# Altium PCB PCB_FinalResult.PcbDoc
Units mil, origin at the board's own origin, x right, y up, seen from the top; angles counter-clockwise.
Board outline 3784.99 x 2012.51 mil, 2 copper layers (Top Layer, Bottom Layer); 61 components, 39 nets, 231 pads, 83 vias.
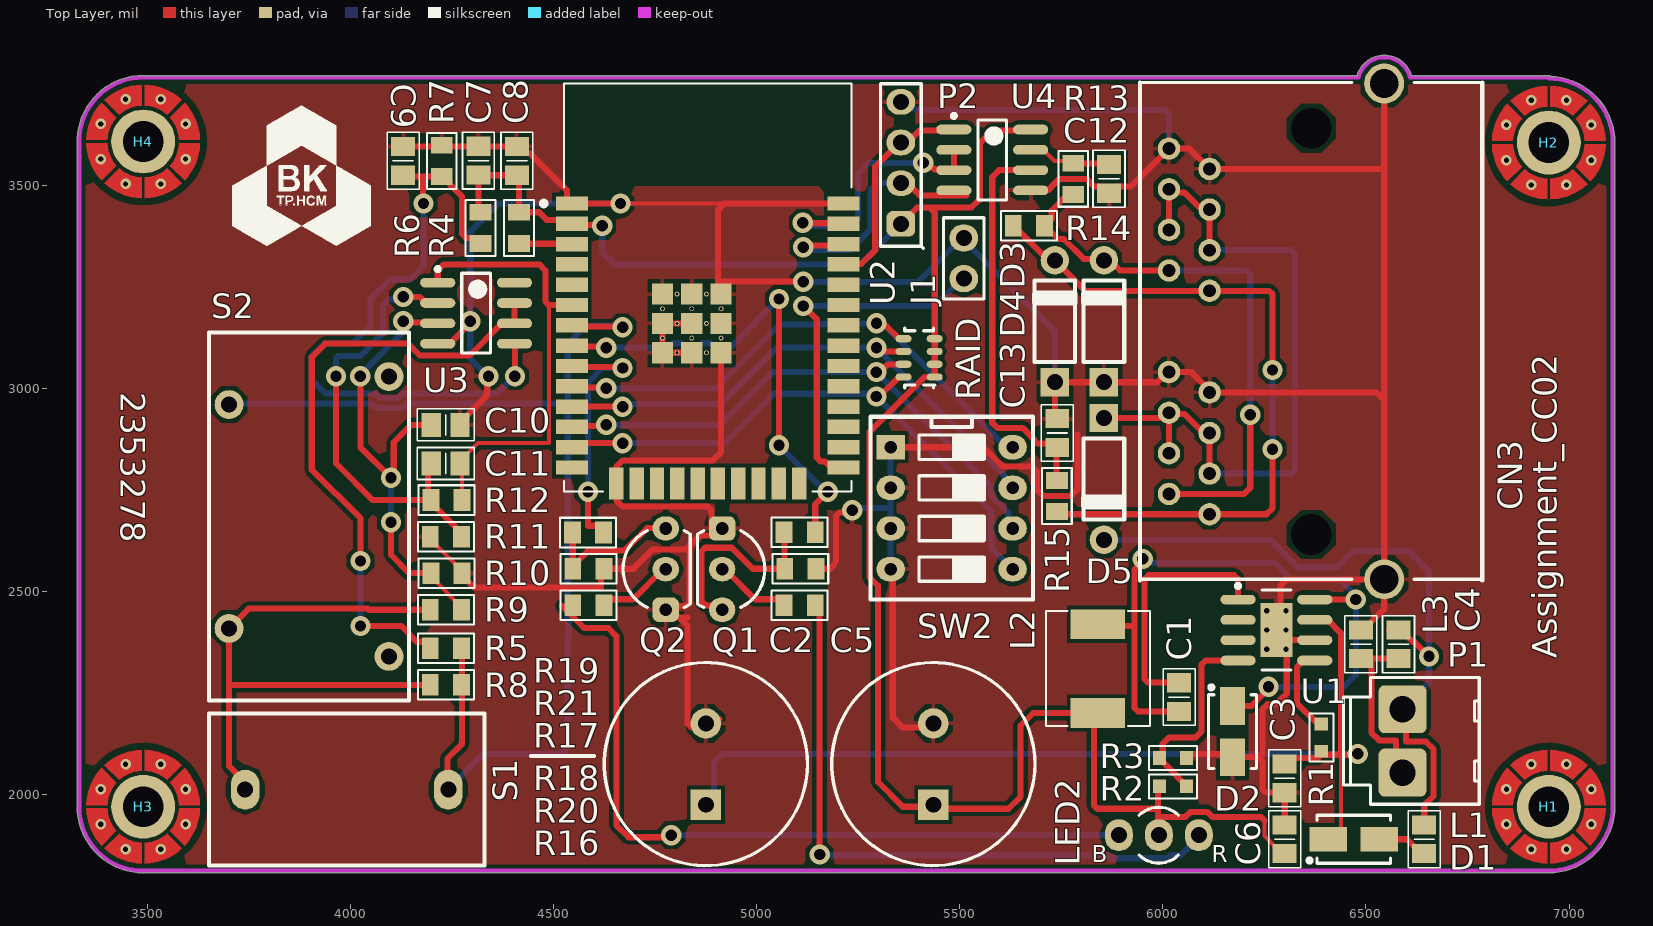
[diagram p0: Top Layer view]
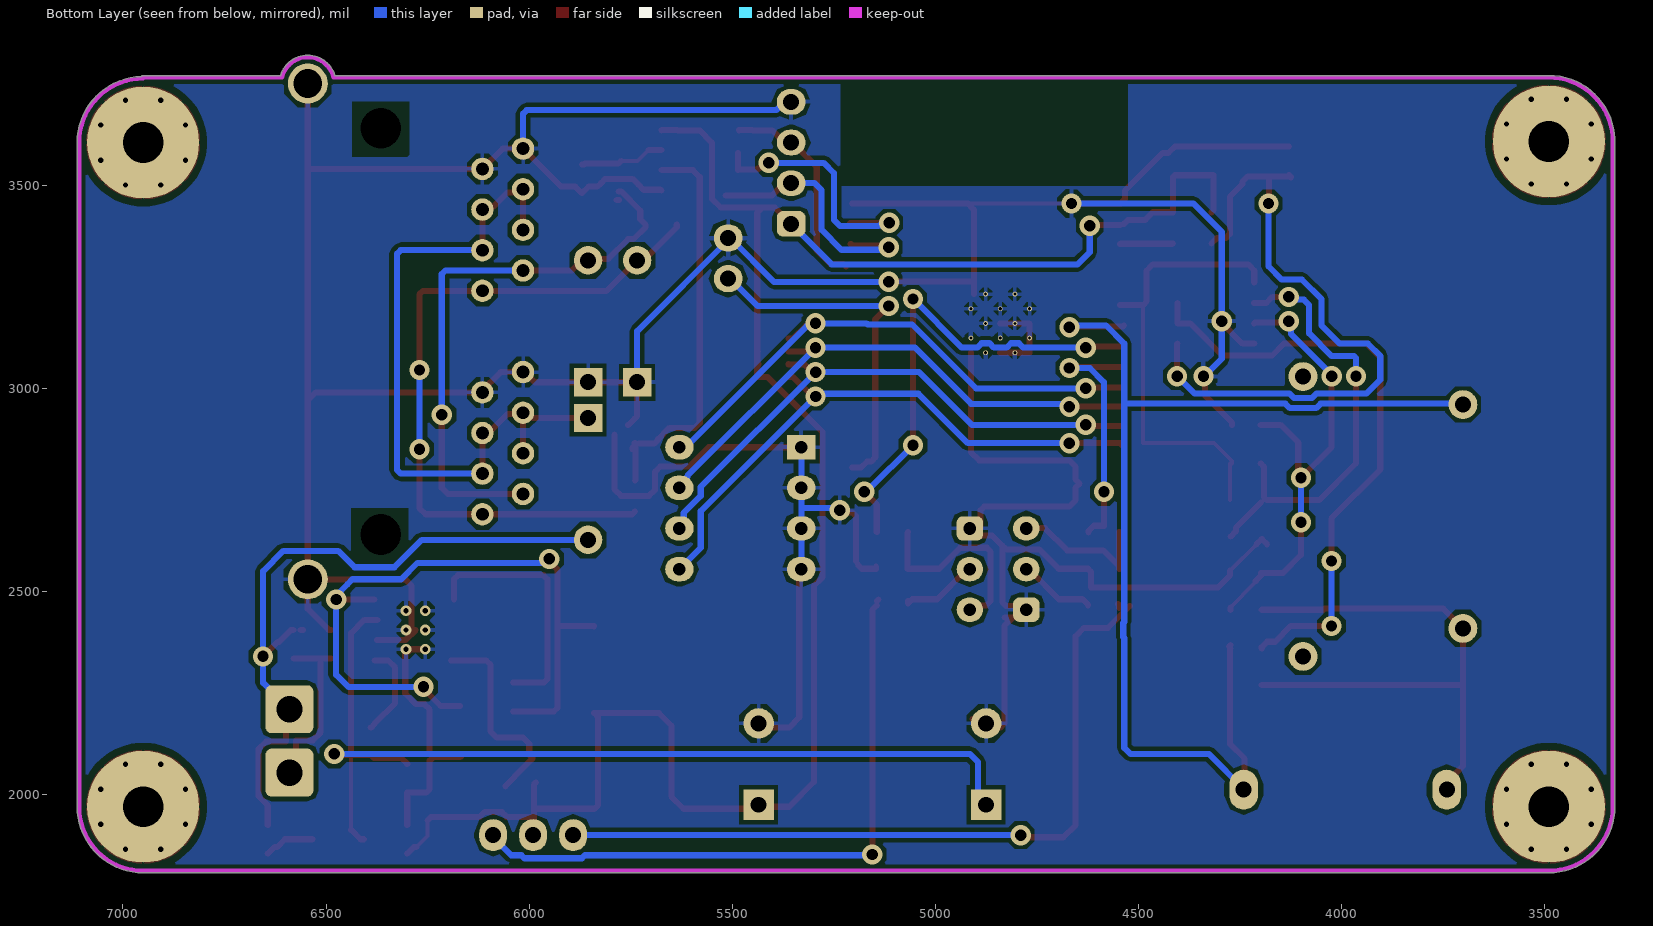
[diagram p1: Bottom Layer view, seen from below]

## Layer stack, top to bottom
Top Solder: solder mask 0.4, Solder Resist, Dk 3.5
Top Layer: signal copper 1.4
Dielectric 1: dielectric 12.6, FR-4, Dk 4.8
Bottom Layer: signal copper 1.4
Bottom Solder: solder mask 0.4, Solder Resist, Dk 3.5

## Board outline
3327.51,1969.8 ccw(c3490,1970) 3490,1807.51 6950,1807.51 ccw(c6950,1970) 7112.49,1970 7112.49,3605 ccw(c6950,3605) 6954.38,3767.43 ccw(c6950,3765) 6950,3770.01 6611.86,3770.01 ccw(c6545,3750.31) 6478.14,3770.01 3489.99,3770.01 ccw(c3489.99,3607.52) 3327.62,3613.78 3327.5,3612.68

## Design rules (kind name [scope] priority, off if disabled: settings)
Clearance Clearance_1 [InNamedPolygon('GND_L01_P000')] p1: gap=10 ignorepadtopadclearanceinfootprint=FALSE
Clearance [All] p2: gap=10 ignorepadtopadclearanceinfootprint=FALSE except(0: Arc-Hole Track-Hole SMDPad-Hole THPad-Hole Via-Hole Fill-Hole Poly-Hole Region-Hole Text-Hole)
ComponentClearance [InComponent('H*') OR InComponent('S1')] p1: gap=0 collisioncheckmode=3 verticalgap=0 showdistances=FALSE
Height [All] p1: minheight=0 maxheight=1181.1 prefheight=500
MinimumSolderMaskSliver [IsText] p1: minsoldermaskwidth=10
PasteMaskExpansion [All] p1: expansion=10 thpadusetoppaste=TRUE thpadusebottompaste=TRUE
PolygonConnect [All] p1: connectstyle=Relief reliefconductorwidth=10 reliefentries=4 polygonreliefangle="90 Angle" airgapwidth=10
RoutingVias [All] p1: holewidth=28 width=50 viastyle="Through Hole" minholewidth=28 minwidth=50 maxholewidth=28 maxwidth=50
SilkToSilkClearance [IsText] p1: silktosilkclearance=10
SilkToSolderMaskClearance [IsText] p1: minsilkscreentomaskgap=10 clearancetoexposedcopper=TRUE
SolderMaskExpansion [All] p1: expansion=5 istentingtop=FALSE soldermaskfromhole=TRUE
UnpouredPolygon [All] p1: allowunpoured=TRUE allowshelved=TRUE
Width [All] p1: maxlimit=78.74 minlimit=7.87 preferedwidth=15.75 minimp=50.000000 maximp=50.000000 favimp=50.000000
23 further rules are at their usual default settings.

## Classes and differential pairs
component class "Slide Switch with an MCU": RAID SW2
component class RS-485: C12 C13 CN3 D3 D4 D5 R13 R14 R15 U4
component class "High-currenr LEDs": LED2 Q1 Q2 R16 R17 R18 R19 R20 R21
component class "ESP32_WROM_32 part": C7 C8 J1 P2 R4 U2
component class "Current sensor circuit": C9 C10 C11 R5 R6 R7 R8 R9 R10 R11 R12 S1 S2 U3
component class "3.3V regulator IC TPS5430": C1 C2 C3 C4 C5 C6 D1 D2 H2 H3 H4 L1 L2 L3 P1 R1 R2 R3 U1

## Components (designator, comment, footprint, x,y, rotation, side; value= is the part's Value field where it differs from the comment)
C1 "10nF" "C 0805" 6040,2240 r270 top
C2 "100uF/35V" CYL/D.500/LS.200 4875,2075 r90 top
C3 "0.1uF" "C 0805" 6300,2040 r270 top
C4 "1uF" "C 0805" 6580,2370 r270 top
C5 "220uF/16V" CYL/D.500/LS.200 5435,2075 r90 top
C6 "0.1uF" "C 0805" 6300,1890 r90 top
C7 "0.1uF" "C 0805" 4315.26,3560.43 r90 top
C8 "22uF" "C 0805" 4410,3560 r90 top
C9 "1uF" "C 0805" 4130,3560 r90 top
C10 "100pF" "C 0805" 4234.57,2910 r0 top
C11 "100pF" "C 0805" 4234.57,2815 r0 top
C12 "N/A" "C 0805" 5867.5,3515.78 r90 top
C13 "N/A" "C 0805" 5740,2890 r90 top
CN3 "RJ45 x2" CONN/RJ45/x2 6365,3140 r90 top
D1 "SS34" "DO-214AC (SMA)" 6470,1890 r180 top
D2 "SS34" "DO-214AC (SMA)" 6171.35,2155 r90 top
D3 "" DO-41 5855,3015 r90 top
D4 "" DO-41 5734.17,3015 r90 top
D5 "SS14" DO-41 5855,2926.99 r270 top
H1 "Screw Hole" SCREW/3.2/7.0/M 6950,1970 r0 top
H2 "Screw Hole" SCREW/3.2/7.0/M 6950,3605 r0 top
H3 "Screw Hole" SCREW/3.2/7.0/M 3490,1970 r0 top
H4 "Screw Hole" SCREW/3.2/7.0/M 3490,3607.52 r0 top
J1 "JUMP 2" JUMP/2/Close 5510,3370 r270 top
L1 "FB" "L 0805 (2012)" 6643.4,1890 r270 top
L2 "15uH" IND_SRP6540-150M 5840,2310 r270 top
L3 "FB" "L 0805 (2012)" 6487.31,2370 r90 top
LED2 "RB LED" LED-BICOLOR-3MM 6088.43,1900 r270 top
P1 "Header 2" HDR/Header/2/VH 6590,2132.05 r270 top
P2 "Header 4" HDR/Header/4 5355,3555 r90 top
Q1 "MMBT3904LT1G" TO-92/W100 4915.11,2555 r270 top
Q2 "MMBT3904LT1G" TO-92/W100 4776.11,2555 r90 top
R1 "N/A" "R 0603" 6390,2140 r90 top
R2 "10.0k" "R 0603" 6025,2020 r180 top
R3 "5.9k" "R 0603" 6025,2090 r180 top
R4 "10k" "R 0805" 4415,3395 r90 top
R5 "1k" "R 0805" 4235,2360 r0 top
R6 "1k" "R 0805" 4320.27,3395 r90 top
R7 "1k" "R 0805" 4224.99,3560 r270 top
R8 "100" "R 0805" 4235,2270 r0 top
R9 "1k" "R 0805" 4235,2455 r180 top
R10 "1k" "R 0805" 4236.61,2545 r180 top
R11 "1k" "R 0805" 4235,2635 r0 top
R12 "1k" "R 0805" 4236.61,2725 r0 top
R13 "10" "R 0805" 5778.93,3515.81 r270 top
R14 "120" "R 0805" 5670,3400 r0 top
R15 "10" "R 0805" 5739.3,2735 r270 top
R16 "330" "R 0805" 5105.81,2465.81 r0 top
R17 "330" "R 0805" 4585.81,2465.81 r180 top
R18 "4.7k" "R 0805" 5105.81,2645.81 r0 top
R19 "4.7k" "R 0805" 4585,2645 r0 top
R20 "47k" "R 0805" 5107.42,2555.81 r180 top
R21 "47k" "R 0805" 4585.81,2555.81 r180 top
RAID "10k" "RA4 1206 (3216)" 5400,3075 r180 top
S1 "TA12" TA12 3991.07,2012.01 r180 top
S2 "TA17" TA17 3898.15,2684.49 r270 top
SW2 "SW DIP-4" SW/DIP4 5330,2855 r270 top
U1 "TPS5430" "SOIC-8 EP" 6279.49,2405 r0 top
U2 "ESP32-WROOM-32" MODULE_ESP32-WROOM-32 4879.65,3247.91 r0 top
U3 "LM358" SOIC-8 4309.49,3185 r0 top
U4 "MAX485" SOIC-8 5580,3562.09 r0 top

## Footprints (in the part's own frame and the unit in brackets; to place one, negate y for a bottom-side part, rotate by r counter-clockwise, add the part's x,y. Pads: shape width x height; smd on the part's side, far side on the other; paste and mask are expansions set on the pad)
"C 0805" [mm] "Chip Capacitor, 2-Leads, Body 2.0x1.3mm, IPC Medium Density"
  rect 1.2x1.5 smd: 1(-0.9,0) 2(0.9,0)
  silkscreen extent -1.78,-1 1.78,1, body extent -1,-0.64 1,0.61, height 0.6
CONN/RJ45/x2 [mm]
  round 1.4 hole 0.8: 1(-11.43,6.35) 2(-10.16,8.89) 3(-8.89,6.35) 4(-7.62,8.89) 5(-6.35,6.35) 6(-5.08,8.89) 7(-3.81,6.35) 8(-2.54,8.89) 11(2.54,6.35) 12(3.81,8.89) 13(5.08,6.35) 14(6.35,8.89) 15(7.62,6.35) 16(8.89,8.89) 17(10.16,6.35) 18(11.43,8.89)
  round 2.5 hole 1.8: 9(-15.5,-4.57) 10(15.5,-4.57)
  round 0 hole 2.54 unplated: HOLE(-12.7,0) HOLE(12.7,0)
  silkscreen extent -15.56,-10.7 15.56,10.7, body extent -15.5,-10.7 15.56,10.7, height 13.46
CYL/D.500/LS.200 [mil]
  rect 75x75 hole 39: 1(-100,0)
  round 75 hole 39: 2(100,0)
  silkscreen extent -250,-250 250,250, body extent -256,-255 254,255, height 866
DO-41 [mil]
  rect 70x70 hole 39.37: 1(0,0)
  round 70 hole 39.37: 2(300,0)
  silkscreen extent 50,-55 250,55, body extent -15,-47 315,47, height 99
"DO-214AC (SMA)" [mm] "Molded Diode, 2-Leads, Body 4.3x2.7mm, IPC Medium Density"
  rect 2.35x1.55 smd: 1(-1.6,0) 2(1.6,0)
  silkscreen extent -2.3,-1.5 2.89,1.5, body extent -2.6,-1.3 2.6,1.3, height 2.4
HDR/Header/2/VH [mm]
  rrect25% 3x3 hole 1.65: 1(-1.98,0) 2(1.98,0)
  silkscreen extent -3.96,-3.7 3.96,4.8, body extent -3.93,-3.7 3.93,4.8, height 10.6
HDR/Header/4 [mm]
  rrect50% 1.6x1.8 hole 1: 1(-3.81,0)
  oval 1.6x1.8 hole 1: 2(-1.27,0) 3(1.27,0) 4(3.81,0)
  silkscreen extent -5.33,-1.4 4.95,1.27, body extent -5.08,-1.27 5.08,1.27, height 8.89
IND_SRP6540-150M [mm]
  rect 1.85x3.4 smd: 1(-2.775,0) 2(2.775,0)
  silkscreen extent -3.6,-3.25 3.6,3.25
JUMP/2/Close [mm]
  oval 1.7x1.8 hole 1: 1(0,0) 2(2.54,0)
  silkscreen extent -1.27,-1.27 3.81,1.27, body extent -1.27,-1.27 3.81,1.27, height 8.89
"L 0805 (2012)" [mm] "Chip Capacitor, 2-Leads, Body 2.0x1.3mm, IPC Medium Density"
  rect 1.2x1.5 smd: 1(-0.9,0) 2(0.9,0)
  silkscreen extent -1.78,-1 1.78,1, body extent -1,-0.6 1,0.6, height 0.95
LED-BICOLOR-3MM [mm] "Diode, Axial; Body 5.2 x 2.7 mm (LxDia. max), Lead Dia. 0.86 mm (max)"
  oval 2x1.75 hole 1: 1(0,0) 2(0,-2.5) 3(0,-5)
  silkscreen extent -1.75,-3.74 1.75,-1.26, body extent -2.02,-5.29 2.02,0.29, height 6.76
MODULE_ESP32-WROOM-32 [mm]
  rect 2x0.9 smd: 1(-8.5,5.26) 2(-8.5,3.99) 3(-8.5,2.72) 4(-8.5,1.45) 5(-8.5,0.18) 6(-8.5,-1.09) 7(-8.5,-2.36) 8(-8.5,-3.63) 9(-8.5,-4.9) 10(-8.5,-6.17) 11(-8.5,-7.44) 12(-8.5,-8.71) 13(-8.5,-9.98) 14(-8.5,-11.25) 25(8.5,-11.25) 26(8.5,-9.98) 27(8.5,-8.71) 28(8.5,-7.44) 29(8.5,-6.17) 30(8.5,-4.9) 31(8.5,-3.63) 32(8.5,-2.36) 33(8.5,-1.09) 34(8.5,0.18) 35(8.5,1.45) 36(8.5,2.72) 37(8.5,3.99) 38(8.5,5.26)
  rect 0.9x2 smd: 15(-5.715,-12.25) 16(-4.445,-12.25) 17(-3.175,-12.25) 18(-1.905,-12.25) 19(-0.635,-12.25) 20(0.635,-12.25) 21(1.905,-12.25) 22(3.175,-12.25) 23(4.445,-12.25) 24(5.715,-12.25)
  rect 1.33x1.33 smd: 39(-2.835,-4.075) 39(-2.835,-2.24) 39(-2.835,-0.405) 39(-1,-4.075) 39(-1,-2.24) 39(-1,-0.405) 39(0.835,-4.075) 39(0.835,-2.24) 39(0.835,-0.405)
  round 0.3 hole 0.2: 39(-2.835,-3.157) 39(-2.835,-1.322) 39(-1.917,-4.075) 39(-1.917,-2.24) 39(-1.917,-0.405) 39(-1,-3.157) 39(-1,-1.322) 39(-0.082,-4.075) 39(-0.082,-2.24) 39(-0.082,-0.405) 39(0.835,-3.157) 39(0.835,-1.322)
  Top Layer pour cut-out: -9.017,12.827 -9.017,6.35 9.017,6.35 9.017,12.827
  Bottom Layer pour cut-out: -9.017,12.827 -9.017,6.35 9.017,6.35 9.017,12.827
  silkscreen extent -10.4,-12.75 9,12.75, body extent -9,-12.75 9,12.75, height 2.91
"R 0603" [mm] "Chip Resistor, 2-Leads, Body 1.6x0.8mm, IPC Medium Density"
  rect 0.8x0.85 smd: 1(-0.85,0) 2(0.85,0)
  silkscreen extent -1.5,-0.75 1.5,0.75, body extent -0.8,-0.4 0.8,0.4, height 0.5
"R 0805" [mm] "Chip Resistor, 2-Leads, Body 2.0x1.3mm, IPC Medium Density"
  rect 1.05x1.35 smd: 1(-0.975,0) 2(0.975,0)
  silkscreen extent -1.75,-0.92 1.75,0.92, body extent -1,-0.61 1,0.59, height 0.5
"RA4 1206 (3216)" [mm] "Resistor Array x4 1206 (4D03)"
  oval 1x0.45 smd: 1(-0.975,1.2) 2(-0.975,0.4) 3(-0.975,-0.4) 4(-0.975,-1.2) 5(0.975,-1.2) 6(0.975,-0.4) 7(0.975,0.4) 8(0.975,1.2)
  silkscreen extent -0.99,-1.88 0.9,1.88, body extent -0.8,-1.6 0.8,1.6, height 0.5
SCREW/3.2/7.0/M [mm]
  round 4 / inner round 7 / far side round 7 hole 2.54: 1(0,0)
  Top Layer pour cut-out: -4,0 -3.696,1.531 -2.828,2.828 -1.531,3.695 0,4 0,4 1.531,3.695 2.828,2.828 3.695,1.531 4,0 4,0 3.696,-1.531 2.828,-2.828 1.531,-3.696 0,-4 0,-4 -1.531,-3.696 -2.828,-2.828 -3.696,-1.531 -4,0
  Top Layer region: -0.1,-2.25 -0.325,-2.225 -0.575,-2.175 -0.8,-2.1 -0.975,-2.025 -1.125,-1.95 -1.25,-1.875 -1.375,-1.775 -1.5,-1.675 -2.425,-2.6 -2.225,-2.775 -2.025,-2.925 -1.825,-3.05 -1.6,-3.175 -1.375,-3.275 -1.175,-3.35 -0.95,-3.425 -0.725,-3.475 -0.6,-3.5 -0.45,-3.525 -0.1,-3.55
  Top Layer region: 0.1,-2.25 0.325,-2.225 0.575,-2.175 0.8,-2.1 0.975,-2.025 1.125,-1.95 1.25,-1.875 1.375,-1.775 1.5,-1.675 2.425,-2.6 2.225,-2.775 2.025,-2.925 1.825,-3.05 1.6,-3.175 1.375,-3.275 1.175,-3.35 0.95,-3.425 0.725,-3.475 0.6,-3.5 0.45,-3.525 0.1,-3.55
  Top Layer region: 2.25,0.1 2.225,0.325 2.175,0.575 2.1,0.8 2.025,0.975 1.95,1.125 1.875,1.25 1.775,1.375 1.675,1.5 2.6,2.425 2.775,2.225 2.925,2.025 3.05,1.825 3.175,1.6 3.275,1.375 3.35,1.175 3.425,0.95 3.475,0.725 3.5,0.6 3.525,0.45 3.55,0.1
  Top Layer region: 2.25,-0.1 2.225,-0.325 2.175,-0.575 2.1,-0.8 2.025,-0.975 1.95,-1.125 1.875,-1.25 1.775,-1.375 1.675,-1.5 2.6,-2.425 2.775,-2.225 2.925,-2.025 3.05,-1.825 3.175,-1.6 3.275,-1.375 3.35,-1.175 3.425,-0.95 3.475,-0.725 3.5,-0.6 3.525,-0.45 3.55,-0.1
  Top Layer region: 0.1,2.25 0.325,2.225 0.575,2.175 0.8,2.1 0.975,2.025 1.125,1.95 1.25,1.875 1.375,1.775 1.5,1.675 2.425,2.6 2.225,2.775 2.025,2.925 1.825,3.05 1.6,3.175 1.375,3.275 1.175,3.35 0.95,3.425 0.725,3.475 0.6,3.5 0.45,3.525 0.1,3.55
  Top Layer region: -0.1,2.25 -0.325,2.225 -0.575,2.175 -0.8,2.1 -0.975,2.025 -1.125,1.95 -1.25,1.875 -1.375,1.775 -1.5,1.675 -2.425,2.6 -2.225,2.775 -2.025,2.925 -1.825,3.05 -1.6,3.175 -1.375,3.275 -1.175,3.35 -0.95,3.425 -0.725,3.475 -0.6,3.5 -0.45,3.525 -0.1,3.55
  Top Layer region: -2.25,-0.1 -2.225,-0.325 -2.175,-0.575 -2.1,-0.8 -2.025,-0.975 -1.95,-1.125 -1.875,-1.25 -1.775,-1.375 -1.675,-1.5 -2.6,-2.425 -2.775,-2.225 -2.925,-2.025 -3.05,-1.825 -3.175,-1.6 -3.275,-1.375 -3.35,-1.175 -3.425,-0.95 -3.475,-0.725 -3.5,-0.6 -3.525,-0.45 -3.55,-0.1
  Top Layer region: -2.25,0.1 -2.225,0.325 -2.175,0.575 -2.1,0.8 -2.025,0.975 -1.95,1.125 -1.875,1.25 -1.775,1.375 -1.675,1.5 -2.6,2.425 -2.775,2.225 -2.925,2.025 -3.05,1.825 -3.175,1.6 -3.275,1.375 -3.35,1.175 -3.425,0.95 -3.475,0.725 -3.5,0.6 -3.525,0.45 -3.55,0.1
  Bottom Layer pour cut-out: -4,0 -3.696,1.531 -2.828,2.828 -1.531,3.695 0,4 0,4 1.531,3.695 2.828,2.828 3.695,1.531 4,0 4,0 3.696,-1.531 2.828,-2.828 1.531,-3.696 0,-4 0,-4 -1.531,-3.696 -2.828,-2.828 -3.696,-1.531 -4,0
SOIC-8 [mm] "SOIC, 8-Leads, Body 5.0x4.0mm (max), Pitch 1.27mm, IPC Medium Density"
  oval 2.2x0.6 smd: 1(-2.4,1.905) 2(-2.4,0.635) 3(-2.4,-0.635) 4(-2.4,-1.905) 5(2.4,-1.905) 6(2.4,-0.635) 7(2.4,0.635) 8(2.4,1.905)
  silkscreen extent -2.52,-2.5 0.9,2.88, body extent -3,-2.49 3,2.41, height 1.75
"SOIC-8 EP" [mm] "SOIC, 8-Leads, Body 5.0x4.0mm (max), Pitch 1.27mm, IPC Medium Density"
  oval 2.2x0.6 smd: 1(-2.4,1.905) 2(-2.4,0.635) 3(-2.4,-0.635) 4(-2.4,-1.905) 5(2.4,-1.905) 6(2.4,-0.635) 7(2.4,0.635) 8(2.4,1.905)
  rect 2x3.4 smd: 9(0,0)
  silkscreen extent -2.52,-2.5 0.9,2.88, body extent -3,-2.49 3,2.41, height 1.75
SW/DIP4 [mil]
  rect 60x70 hole 31: 1(0,0)
  oval 60x70 hole 31: 2(100,0) 3(200,0) 4(300,0) 5(300,300) 6(200,300) 7(100,300) 8(0,300)
  silkscreen extent -75,-50 375,350, body extent -50,0 350,300, height 165
TA12 [mm]
  oval 1.8x2.5 hole 1: 1(-6.35,0) 2(6.35,0)
  silkscreen extent -8.6,-4.75 8.6,4.75, body extent -8.6,-4.75 8.6,4.75, height 20.4
TA17 [mm]
  round 1.8 hole 1: 1(-7,-5) 2(7,-5) 3(8.75,5) 4(-8.75,5)
  silkscreen extent -11.5,-6.25 11.5,6.25, body extent -11.5,-6.25 11.5,6.25, height 26
TO-92/W100 [mil]
  rrect50% 60x65 hole 31: 1(-100,0)
  oval 60x65 hole 31: 2(0,0) 3(100,0)
  silkscreen extent -95,-60 95,105, body extent -114,-60 112,105, height 370

## Part data
C1 C3 C4 C6 C7 C8 C9 C10 C11 C12 C13: library part "Capacitor NP", "Capacitor non-pol"
C2 C5: library part Capacitor, "Capacitor pol"
CN3: library part "CON RJ45 x2", "Connector RJ45 X2"
D1 D5: library part Diode, "Default Diode"
D2 D3 D4: library part "Diode Zener", "Zener Diode"
L1 L3: library part Inductor, "Inductor"
L2: library part SRP6540-150M, "15ÂµH Shielded Wirewound Inductor 2.9A 121mOhm Max Nonstandard", PACKAGE="Nonstandard Bourns", Check_prices=https://www.snapeda.com/parts/SRP6540-150M/Bourns/view-part/613418/?ref=eda, Digi-Key_Part_Number=SRP6540-150MCT-ND, MF=Bourns, MP=SRP6540-150M, Purchase-URL=https://pricing.snapeda.com/search/part/SRP6540-150M/?ref=eda, SnapEDA_Link=https://www.snapeda.com/parts/SRP6540-150M/Bourns/view-part/613418/?ref=snap
LED2: library part "LED 2-color-A", "Bicolor RB 3mm LED"
P1: "Header, 2-Pin"
P2: "Header, 4-Pin"
Q1 Q2: library part "Transistor NPN", "NPN Bipolar Transistor"
R1 R2 R3 R4 R5 R6 R7 R8 R9 R10 R11 R12 R13 R14 R15 R16 R17 R18 R19 R20 R21: library part Resistor, "Resistor"
RAID: library part "Resistor Array 4", "Resistor Array 4"
U1: library part TPS54xx, "3/5A, Wide input range, Step-down SWIFT DC-DC Converter"
U2: "Bluetooth, WiFi 802.11b/g/n, Bluetooth v4.2 + EDR, Class 1, 2 and 3 Transceiver Module 2.4GHz ~ 2.5GHz Integrated, Trace Surface Mount", PACKAGE="Module Espressif Systems", Availability=Unavailable, MF="Espressif Systems", MP=ESP32-WROOM-32D, Price=None, SnapEDA_Link=https://www.snapeda.com/parts/ESP32-WROOM-32D/Espressif%20Systems/view-part/2768115/?ref=snap
U3: "Low Power Dual Operational Amplifiers"
U4: "Low-Power, Slew-Rate-Limited  RS-485/RS-422 Transceivers"
H1 H2 H3 H4: TYPE=NO-BOM, UNIT PRICE=0

## Via types
v1: diameter 50, hole 28, Top Layer to Bottom Layer, 45 vias
v2: diameter 25.98, hole 12.99, Top Layer to Bottom Layer, 38 vias

## Nets (pads, with @x,y where several pads share a name; then routed paths per layer and width w, separated by ;. In a path a pad name is that pad's centre, name@x,y a point inside that pad or via, vN(x,y) a via of type N, cw(c..) or ccw(c..) an arc to the next point about the centre after c; other vN are vias at no path point)
3V3: C5.1 C6.1 C7.1 C8.1 L2.2 LED2.2 P2.1 R2.2 R4.2 R6.2 RAID.1 RAID.2 RAID.3 RAID.4 U2.2 U4.8 | length 5028.8
  Top Layer w10: 6250,1936.21 6250,1897.53 C6.1@6276.85,1870.69
  Top Layer w15: R6.2 4315.26,3438.4 C7.1 4315.69,3524.57 C8.1 4415,3519.57 R4.2 4464.52,3433.39 4483.13,3414.77 4525.73,3414.77 U2.2@4535.5,3405 ; U2.2@4545,3402.5 4617.5,3402.5 v1(4620,3400) ; P2.1 5355.34,3405 5395.46,3445.12 5425.12,3445.12 5426.18,3444.06 5438.39,3431.85 RAID.4 5438.39,3092 5437.13,3090.75 5438.39,3089.49 5438.39,3060.51 RAID.2@5437.13,3059.25 ; 5427.24,3445.12 5528.58,3445.12 5549.95,3466.49 5549.95,3604.95 5580,3635 5634.8,3635 5635.25,3635.44 5673.72,3635.44 U4.8@5674.16,3635 ; RAID.2@5435,3059.25 RAID.2@5437.13,3059.25 ; RAID.1 5413.01,3027.76 5277.5,2892.25 5277.5,2535.32 5298.79,2514.04 5298.79,2031.21 5360,1970 5465,1970 5470,1965 5620,1965 5650,1995 5650,2170 5680.75,2200.75 L2.2 5830,2190.75 5830,1973.79 5838.79,1965 5988.27,1965 ; RAID.1@5438.39,3029.01 5438.39,3058 RAID.2@5437.13,3059.25 ; R2.2@5983.29,2029.98 5988.27,2025 5988.27,1965 ; LED2.2 5988.27,1901.73 5988.27,1950 ; 6250,1936.21 6241.21,1945 6121.81,1945 6109.94,1956.87 6066.87,1956.87 6055,1945 5993.27,1945 5988.27,1950 ; C6.1@6276.85,1870.69 6283.88,1870.69 C6.1 ; 5988.27,1950 5988.27,1965
  Bottom Layer w15: v1(4620,3400) 4620,3335 4650,3305 5255,3305 P2.1
"ADC1 CH6": C11.2 R12.2 U2.6 U3.1 | length 1125.2
  Top Layer w10: C11.2 4270,2820.91 4314.09,2865 4488.79,2865 4488.79,3205 ; R12.2 C11.2@4275,2815
  Top Layer w15: U3.1 4215,3290 4230,3305 4465,3305 4480,3290 4480,3213.79 4488.79,3205 U2.6
"ADC1 CH7": R5.2 R8.2 S1.1 S2.1 U2.7 | length 2840.4
  Top Layer w15: S1.1@4239.08,2012.01 4239.08,2089.08 4275,2125 4275,2358.39 R5.2 ; R5.2@4273.39,2367.84 R5.2@4276.77,2364.46 ; U2.7@4535.5,3155 4538,3152.5 4667.5,3152.5 v1(4670,3150)
  Bottom Layer w15: S2.1 3703.72,2962.5 4051.26,2962.5 4062.72,2951.04 4127.28,2951.04 4138.74,2962.5 4535,2962.5 ; S1.1@4239.08,2012.01 4327.08,2100 4520,2100 4535,2115 4535,2384.9 4537.5,2387.4 4537.5,2422.6 4535,2425.1 4535,2962.5 ; v1(4670,3150) 4665,3155 4580,3155 4535,3110 4535,2962.5
GND: C2.2 C3.2 C5.2 C6.2 C7.2 C8.2 C9.2 C10.2 C12.1 C13.2 CN3.7 CN3.8 CN3.9 CN3.10 CN3.17 CN3.18 D2.1 D3.1 D4.1 J1.1 L3.2 P2.4 Q1.1 Q2.1 R3.1 R7.1 R10.1 R11.1 R20.1 R21.1 SW2.1 SW2.2 SW2.3 SW2.4 U1.6 U1.9 U2.1 U2.15 U2.38 U2.39 U3.4 U4.5 | length 13199.7
  Top Layer w10: R11.1@4209.98,2615.93 R10.1@4275,2550.91 ; v1(4665,3455) 4920,3455
  Top Layer w15: C9.2 C8.2 4426.12,3579.31 4440.69,3579.31 4533.57,3486.43 4533.57,3465.22 4543.79,3455 U2.1 4565,3455 v1(4665,3455) ; R11.1@4183.44,2615.93 4196.61,2629.09 4209.78,2615.93 R11.1@4209.98,2615.93 ; U3.4 4244.16,3110 4295,3160.84 v1(4295,3165) ; C10.2 4270,2915.91 4336.59,2982.5 4336.59,3026.59 v1(4340,3030) ; R10.1@4275,2550.91 4275,2539.09 4304.21,2509.88 4484.88,2509.88 4617.02,2509.88 4617.02,2548.63 R21.1 4696.42,2555.81 4743.92,2603.31 4825.81,2603.31 4835,2612.5 ; Q2.1@4775.56,2450.56 4788.98,2437.13 4807.87,2437.13 4808.69,2436.31 ; Q2.1@4775.81,2450.81 4789.63,2464.63 4826.21,2464.63 4835,2473.41 4835,2612.5 ; 4830.31,2436.31 4808.69,2436.31 ; U2.39@4840.28,3087.48 4804.15,3087.48 4768.03,3087.48 4768.03,3123.6 4768.03,3159.72 4804.15,3159.72 U2.39@4840.28,3159.72 ; C2.2@4885,2165 4840,2165 4830,2175 4830,2415 4808.69,2436.31 ; C2.2@4885,2175 C2.2 4886.48,2186.48 C2.2@4908.48,2186.48 ; Q1.1@4888.5,2655 4888.5,2699.97 4879.71,2708.76 4670.18,2708.76 4655.36,2723.58 4655.36,2755.41 4645.15,2765.63 4655.36,2775.85 4655.36,2807.68 4670.18,2822.5 4892.5,2822.5 4912.52,2842.52 U2.39@4912.52,3087.48 ; U2.39@4905,3231.97 4905,3262.5 ; Q1.1@4914.31,2650.81 4901.11,2637.61 4860.11,2637.61 4835,2612.5 ; v1(5115,3262.5) 4905,3262.5 ; R20.1@5145.81,2561.71 R20.1 5180.81,2555.81 5190.81,2565.81 ; 5195,2574.54 5195,2685.25 5203.79,2694.04 5229.04,2694.04 v1(5235,2700) ; U2.38@5204.79,3455 4920,3455 4905,3440 4905,3262.5 ; SW2.4 5335,2550 5335,2190 5360,2165 5435,2165 C5.2@5440,2170 ; SW2.1 5557.82,2855 5605.32,2807.5 5677.5,2807.5 5690,2795 5690,2750 5705,2735 5773.61,2735 5790,2751.39 5790,2885.87 ; U4.5 5676.14,3488.74 5718.74,3488.74 5731.92,3501.92 5731.92,3502.41 5745.1,3515.59 5812.75,3515.59 5823,3505.34 5823,3505.25 5831.79,3496.47 5853.88,3496.47 5870,3480.34 5886.06,3496.41 5921.41,3496.41 CN3.18 6015.06,3589.94 6065.06,3589.94 CN3.17 6544.92,3540 ; C13.2@5756.12,2909.31 C13.2 5734.17,2931.27 D4.1 D3.1 5986.15,3015 6011.15,3040 CN3.8 6070,3040 6118.79,2991.21 6118.79,2990 6525,2990 6544.92,2970.08 ; R3.1@6052.92,2100 6162.01,2100 6170,2092.01 D2.1 6236.21,2092.01 ; v2(6255.87,2357.76) 6291.6,2357.76 6297.36,2352 v2(6303.11,2357.76) 6305,2355.87 6305,2248.79 6278.71,2222.5 6257.86,2222.5 6245,2209.64 6245,2100 6237.01,2092.01 6236.21,2092.01 ; U1.9 6304.49,2380 U1.6 ; U1.9@6290,2408.64 6290,2515 6304.76,2529.76 CN3.9 ; C6.2 C3.2 6253.79,2004.57 6245,2013.35 6245,2083.22 6236.21,2092.01 ; L3.2 6493.22,2405.43 6544.92,2457.14 CN3.9 ; CN3.10 6544.92,3540 ; CN3.9 6544.92,2970.08 ; 6544.92,2970.08 6544.92,3540
  Bottom Layer w15: v1(4340,3030) 4337.78,3030 4295,3072.78 v1(4295,3165) 4295,3385 4365,3455 v1(4665,3455) ; v1(5115,3262.5) 5115.89,3261.61 5396.61,3261.61 5505,3370 5734.17,3140.83 D4.1 ; v1(5235,2700) 5240,2705 5330,2705 ; SW2.4 SW2.3 5330,2705 ; SW2.1 SW2.2 5330,2705 ; P2.4 5371.72,3705 5391.72,3685 6006.21,3685 6015,3676.21 CN3.18
  other v2: 6255.87,2405 6303.11,2405 6255.87,2452.24 6303.11,2452.24
LED0: R18.2 U2.8 | length 1228.6
  Top Layer w15: U2.8@4535.5,3105 4538,3102.5 4627.5,3102.5 v1(4630,3100) ; v1(5055,2860) v1(5055,3220) ; R18.2 5144.19,2714.19 v1(5175,2745)
  Bottom Layer w15: v1(4630,3100) 4630.2,3100.2 4783.77,3100.2 4794.46,3110.89 4813.85,3110.89 4824.54,3100.2 4856.01,3100.2 4866.7,3110.89 4886.09,3110.89 4896.78,3100.2 4935.2,3100.2 v1(5055,3220) ; v1(5055,2860) 5165,2750 5170,2750 v1(5175,2745)
LED1: R19.2 U2.9 | length 636.8
  Top Layer w15: U2.9@4535.5,3055 4538,3052.5 4667.5,3052.5 v1(4670,3050) ; v1(4585,2745) 4585,2661.77 4610.22,2661.77 4623.39,2648.6 R19.2
  Bottom Layer w15: v1(4585,2745) 4585,3015.1 4619.9,3050 v1(4670,3050)
NetC1_1: C1.1 U1.1 | length 622.7
  Top Layer w15: C1.1 5963.79,2275.43 5955,2284.22 5955,2530 5965,2540 6175,2540 6185,2530 U1.1
NetC1_2: C1.2 D2.2 L2.1 U1.8 | length 1773.7
  Top Layer w15: L2.1@5840,2414.12 5840.88,2415 5930,2415 ; v1(5950.13,2580) 5950.13,2573.84 5930,2553.71 5930,2415 ; C1.2 5938.79,2204.57 5930,2213.35 5930,2415 ; D2.2@6170,2217.99 D2.2 6217.99,2217.99 6260,2260 v1(6260,2265) ; U1.8@6380.85,2480 v1(6475,2480)
  Bottom Layer w15: v1(5950.13,2580) 5960.13,2570 6275,2570 6315,2530 6435,2530 6447.09,2517.91 6447.09,2517.38 6475,2489.47 v1(6475,2480) 6475,2295 6445,2265 v1(6260,2265) v1@6257.5,2267.5
NetC9_1: C9.1 R6.1 R7.2 U3.5 | length 1624.1
  Top Layer w15: C9.1@4125,3519.57 C9.1@4125.43,3520 ; C9.1 4132.95,3521.61 4178.97,3521.61 ; v1(4180,3455) 4178.97,3456.03 4178.97,3521.61 ; R6.1 4307.1,3369.78 4285.22,3369.78 4275,3380 4275,3471.6 4244.06,3502.54 4244.06,3508.44 4230.9,3521.61 R7.2 4178.97,3521.61 ; U3.5 4405,3108.98 v1(4405,3030)
  Bottom Layer w15: v1(4180,3455) 4180,3300 4147.5,3267.5 4097.5,3267.5 4050,3220 4050,3155 4005,3110 3935,3110 3905,3080 3905,3021.18 3938.68,2987.5 4061.62,2987.5 4073.07,2976.04 4116.93,2976.04 4128.38,2987.5 4362.5,2987.5 v1(4405,3030)
NetC10_1: C10.1 R9.1 R10.2 U3.3 | length 1167.1
  Top Layer w10: R10.2@4211.4,2522.89 R9.1@4273.39,2460.91
  Top Layer w15: v1(4024.57,3030) 4024.57,2855.43 v1(4100,2780) 4106.7,2786.7 4106.7,2866.7 4150,2910 C10.1 ; v1(4100,2670) 4100,2590 4145,2545 R10.2 ; v1(4130.05,3164.95) 4133.35,3161.65 4213.35,3161.65 U3.3 ; R10.2@4197.32,2540 R10.2@4211.4,2525.93 ; R9.1 R9.1@4273.39,2460.91
  Bottom Layer w15: v1(4024.57,3030) 4024.57,3033.41 4124.49,3133.33 4124.49,3159.39 v1(4130.05,3164.95) ; v1(4100,2670) v1(4100,2780)
NetC11_1: C11.1 R11.2 R12.1 U3.2 | length 1088.1
  Top Layer w15: v1(3964.57,3030) 3964.57,2815.43 4055,2725 4185.06,2725 4185.06,2725.86 4191.21,2732.02 4191.21,2807.08 C11.1 ; v1(4130,3225) 4170.41,3225 4185.41,3210 U3.2 ; R12.1@4198.23,2719.09 4260.22,2657.11 4260.22,2648.17 R11.2
  Bottom Layer w15: v1(3964.57,3030) 3964.57,3074.57 3970,3080 4025,3080 4080,3135 4080,3205 4093.3,3218.3 4123.3,3218.3 v1(4130,3225)
NetC12_2: C12.2 R13.1 U4.7 | length 210.4
  Top Layer w10: U4.7@5705.98,3587.09 5733.08,3560 R13.1@5773.12,3560
  Top Layer w15: U4.7 U4.7@5705.98,3587.09 ; R13.1@5773.12,3560 5779.73,3553.39 5842.05,3553.39 5862.82,3553.39 5865,3551.21 C12.2 C12.2@5870,3551.21
NetC13_1: C13.1 R15.1 U4.6 | length 988.3
  Top Layer w15: U4.6 5597.09,3537.09 5580,3520 5580,2915 5592.5,2902.5 5654.68,2902.5 5682.5,2874.68 5682.5,2872.95 5691.29,2864.16 C13.1@5730.41,2864.16 ; R15.1 5737.7,2774.99 5737.7,2849.57 5737.7,2854.57 5737.7,2862.7 5740,2865 5740,2859.57 C13.1@5745,2854.57 ; C13.1@5742.5,2852.07 C13.1@5745,2849.57
NetD1_1: D1.1 L1.2 | length 125.1
  Top Layer w15: D1.1 6600.93,1890 6620.24,1870.69 6627.27,1870.69 L1.2
NetJ1_2: J1.2 U2.25 | length 871.3
  Top Layer w15: v1(5115,3202.5) 5147.92,3169.58 5147.92,2830.03 5158.17,2819.78 5168.36,2819.78 5183.14,2805 U2.25@5204.79,2805
  Bottom Layer w15: v1(5115,3202.5) 5437.5,3202.5 J1.2@5505,3270
NetLED2_1: LED2.1 R16.2 | length 1586.3
  Top Layer w15: R16.2@5140.48,2479.9 R16.2@5143.89,2476.5 ; R16.2 5154.97,2455.03 5154.97,2425.03 ; v1(5155,1852.52) 5155,2425
  Bottom Layer w15: v1(5155,1852.52) 5156.89,1850.63 5862.56,1850.63 5870.06,1843.13 6011.52,1843.13 6019.02,1850.63 6043.98,1850.63 6088.43,1895.08 LED2.1
NetLED2_3: LED2.3 R17.2 | length 1889.7
  Top Layer w15: 4521.61,2464.09 4575.71,2410 4635,2410 4655,2390 4655,1925 4685,1895 4785,1895 v1(4790,1900) ; R17.2@4547.42,2459.9 R17.2 R17.2@4550.02,2468.41
  Bottom Layer w15: v1(4790,1900) LED2.3
NetQ1_1: Q1.3 R18.1 R20.2 | length 503.5
  Top Layer w15: Q1.3@4914.31,2450.81 4899.63,2450.81 4884.63,2465.81 4874.59,2465.81 4864.31,2476.1 4864.31,2598.71 4873.09,2607.5 4939.11,2607.5 4990.81,2555.81 R20.2 5068.23,2556.61 5068.23,2645 R18.1
NetQ1_3: Q1.2 R16.1 | length 191.9
  Top Layer w15: Q1.2@4914.31,2550.81 4925.81,2550.81 4995.81,2480.81 5056.9,2480.81 5067.11,2470.59 R16.1@5067.11,2476.5
NetQ2_1: Q2.3 R19.1 R21.2 | length 366.1
  Top Layer w15: R19.1 R19.1@4547.27,2645.65 ; R19.1@4547.11,2645.81 R19.1@4547.27,2645.65 ; R19.1@4547.42,2645.81 R19.1@4547.27,2645.65 ; Q2.3@4775.31,2650.81 4770.31,2655.81 4730.81,2655.81 4675.93,2600.93 4586.63,2600.93 4547.42,2561.71 R21.2 4547.27,2555.96 R19.1@4547.27,2645.65
NetQ2_3: Q2.2 R17.1 | length 187.9
  Top Layer w15: R17.1 4624.19,2467.64 4637.36,2480.81 4695.81,2480.81 4765.81,2550.81 Q2.2@4775.81,2550.81
NetR1_2: R1.2 U1.5 | length 231.3
  Top Layer w15: U1.5@6380.85,2330 6347.02,2330 6330,2312.98 6330,2225 6380.77,2174.23 6380.77,2173.25 6389.02,2165 R1.2@6390,2165
NetR2_1: R2.1 R3.2 U1.4 | length 509.7
  Top Layer w15: R2.1 6058.46,2020.98 6035.22,2044.23 6035.22,2045.33 5991.54,2089.02 R3.2 5999.78,2098.25 5999.78,2124.78 6015,2140 6080,2140 6095,2155 6095,2320 6105,2330 U1.4 U1.4@6191.87,2330
NetR4_1: R4.1 U2.3 | length 136.6
  Top Layer w15: R4.1@4420.91,3356.61 R4.1 4415.81,3355.81 4544.19,3355.81 U2.3
NetR5_1: R5.1 U3.6 U3.7 | length 1515.5
  Top Layer w15: v1(4025,2415) 4125,2415 4163.78,2376.22 4183.44,2376.22 4196.61,2363.06 R5.1 ; v1(4025,2575) 4025,2680 3905,2800 3905,3076.9 3938.1,3110 4142.05,3110 4171.36,3080.69 4293.17,3080.69 4372.48,3160 U3.6 U3.7
  Bottom Layer w15: v1(4025,2415) v1(4025,2575)
NetR8_1: R8.1 R9.2 S1.2 S2.2 | length 1424.3
  Top Layer w15: S1.2@3739.08,2012.01 3739.08,2032.15 3701.3,2069.93 3701.3,2270 ; R8.1 3701.3,2270 ; R9.2 4045.1,2455 4042.6,2457.5 3749.9,2457.5 S2.2 3701.3,2270
PGND: C4.2 L3.1 P1.2 | length 431.1
  Top Layer w15: L3.1 L3.1@6509.92,2334.57 ; L3.1@6509.87,2334.62 L3.1@6509.92,2334.57 ; C4.2 L3.1@6509.92,2334.57 ; P1.2 6573.79,2070.31 6573.79,2133.44 6532.34,2133.44 6513.44,2152.34 6513.44,2267.66 6513.98,2268.19 6513.98,2330.51 L3.1@6509.92,2334.57
RS485_5V: CN3.3 CN3.4 CN3.5 CN3.6 CN3.13 CN3.14 CN3.15 CN3.16 D5.1 | length 1712
  Top Layer w15: D5.1 5991.13,2926.99 6004.14,2940 CN3.6 ; CN3.4 CN3.6 ; CN3.14@6015,3388.34 6015,3484.6 CN3.16 6022.68,3482.32 6052.68,3482.32 6087.32,3447.68 6107.32,3447.68 CN3.15 ; CN3.3@6115,2792.93 CN3.5@6115,2890.06 ; CN3.5 6107.32,2897.68 6092.32,2897.68 6052.9,2937.1 6017.9,2937.1 CN3.6 ; CN3.13@6115,3333.33 CN3.15@6115,3440.06
  Bottom Layer w15: 6145,2790 6316.21,2790 6325,2798.79 6325,3331.21 6316.21,3340 6145,3340
RS485_A: CN3.1 CN3.11 D4.2 R14.1 R15.2 | length 1743.1
  Top Layer w15: R14.1@5636.61,3402.93 5636.61,3397.02 5708.11,3325.52 5723.64,3325.52 D4.2 5809.17,3240 CN3.11 ; R15.2@5740,2696.61 5746.61,2690 CN3.1 6255,2690 6270,2705 v1(6270,2850) ; 6145,3240 6261.21,3240 6270,3231.21 v1(6270,3045)
  Bottom Layer w15: v1(6270,2850) v1(6270,3045)
RS485_B: CN3.2 CN3.12 D3.2 R13.2 R14.2 | length 1346.7
  Top Layer w15: R13.2@5778.93,3463.63 R13.2@5784.83,3463.63 ; R13.2@5779.66,3484.87 5773.76,3484.87 5726.56,3437.66 5726.56,3416.1 5713.39,3402.93 5713.39,3397.02 5742.91,3367.5 5755.91,3367.5 5805,3318.41 5851.59,3318.41 D3.2 5869.88,3315 5894.88,3290 CN3.12 ; 6045,2740 6200,2740 6215,2755 v1(6215,2935)
  Bottom Layer w15: 6045,3290 6206.21,3290 6215,3281.21 v1(6215,2935)
RS485_EN: U2.37 U4.2 U4.3 | length 653
  Top Layer w15: v1(5113.54,3407.48) 5114.78,3406.24 5209.56,3406.24 U2.37@5209.61,3406.2 ; v1(5410,3555) 5419.47,3555 5432.01,3542.46 5434.64,3542.46 5438.36,3538.74 5483.86,3538.74 U4.3 U4.2@5485.51,3579.4
  Bottom Layer w15: v1(5113.54,3407.48) 5120.23,3400.79 5139.04,3400.79 5139.82,3400 5235,3400 5250,3415 5250,3530 5275,3555 v1(5410,3555)
RXD0: P2.3 U2.35 U4.1 | length 523.2
  Top Layer w15: U2.35@5220,3300 5226.04,3306.04 5257.88,3306.04 5291.97,3340.13 5291.97,3545.9 5351.06,3605 5371.72,3605 5401.72,3635 5449.59,3635 5450.03,3635.44 5483.13,3635.44 U4.1@5483.57,3635
SW1: RAID.5 SW2.8 U2.10 | length 1371.4
  Top Layer w15: U2.10@4535.5,3005 4538,3002.5 4627.5,3002.5 v1(4630,3000) ; v1(5295,3160) 5301.7,3153.3 5319.73,3153.3 5350.79,3122.24 RAID.5
  Bottom Layer w15: v1(4630,3000) 4900,3000 5057.5,3157.5 5166.92,3157.5 5169.42,3160 v1(5295,3160) 5301.7,3153.3 5316.7,3153.3 5615,2855 SW2.8
SW2: RAID.6 SW2.7 U2.11 | length 1373.8
  Top Layer w15: U2.11@4535.5,2955 v1(4670,2955) ; v1(5295,3100) 5304.47,3100 5313.72,3090.75 RAID.6
  Bottom Layer w15: v1(4670,2955) 4676.7,2961.7 4911.7,2961.7 5050,3100 v1(5295,3100) 5610.38,2784.62 5610.38,2781.8 5630,2762.18 SW2.7
SW3: RAID.7 SW2.6 U2.12 | length 1413.8
  Top Layer w15: U2.12@4535.5,2905 4538,2907.5 4627.5,2907.5 v1(4630,2910) ; v1(5294.9,3040) 5304.37,3040 5323.1,3058.73 5361.09,3058.73 RAID.7
  Bottom Layer w15: v1(4630,2910) 4910,2910 5040,3040 v1(5294.9,3040) 5577.5,2757.4 5577.5,2735.32 5619.29,2693.54 5619.29,2665.71 SW2.6
SW4: RAID.8 SW2.5 U2.13 | length 1467
  Top Layer w15: U2.13@4535.5,2855 4545.5,2865 v1(4670,2865) ; v1(5294.9,2979.9) 5302.19,2979.9 5350.05,3027.76 RAID.8
  Bottom Layer w15: v1(4670,2865) 4920,2865 5041.59,2986.59 5288.2,2986.59 v1(5294.9,2979.9) ; v1@5295,2980 5577.5,2697.5 5577.5,2607.43 5629.93,2555 SW2.5
TXD0: P2.2 U2.36 U4.4 | length 638.8
  Top Layer w15: v1(5115,3347.5) 5118.75,3351.25 5204.64,3351.25 U2.36@5208.39,3355 ; P2.2 5371.92,3505 5401.92,3475 5485.51,3475 5517.01,3475
  Bottom Layer w15: v1(5115,3347.5) 5121.33,3341.17 5231.17,3341.17 5280,3390 5280,3487.93 5297.07,3505 P2.2
VIN: C4.1 D5.2 L1.1 P1.1 | length 1694.9
  Top Layer w15: C4.1@6556.36,2405.43 C4.1@6562.26,2405.43 ; C4.1 6585.91,2405.43 6615.65,2375.69 6619.31,2375.69 v1(6655,2340) ; P1.1 6598.79,2201.21 6598.79,2130.65 6647.66,2130.65 6666.56,2111.75 6666.56,1996.44 6643.4,1973.28 L1.1
  Bottom Layer w15: D5.2 6264.18,2626.99 6331.66,2559.51 6429.51,2559.51 6470,2600 6605,2600 6655,2550 v1(6655,2340) 6655,2275 P1.1
"VIN FIL": C2.1 C3.1 D1.2 R1.1 U1.7 | length 2501
  Top Layer w10: D1.2@6438.07,1913.01 6438.07,2098.07
  Top Layer w15: C3.1 6314.57,2090 6381.93,2090 6390,2098.07 6438.07,2098.07 ; U1.7 6405.47,2430 6438.07,2397.4 6438.07,2098.07 ; D1.2 6415.06,1890 D1.2@6438.07,1913.01 ; v1(6480,2100) 6478.07,2098.07 6438.07,2098.07
  Bottom Layer w15: C2.1@4895,1965 4895,2080 4915,2100 v1(6480,2100)
pads on no net: CN3.HOLE H1.1 H2.1 H3.1 H4.1 S2.3 S2.4 U1.2 U1.3 U2.4 U2.5 U2.14 U2.16 U2.17 U2.18 U2.19 U2.20 U2.21 U2.22 U2.23 U2.24 U2.26 U2.27 U2.28 U2.29 U2.30 U2.31 U2.32 U2.33 U2.34 U3.8
copper on no net:
  other v2: 3446.69,1865.67 3533.31,1865.67 6906.69,1865.67 6993.31,1865.67 3385.67,1926.69 3594.33,1926.69 6845.67,1926.69 7054.33,1926.69 3385.67,2013.31 3594.33,2013.31 6845.67,2013.31 7054.33,2013.31 3446.69,2074.33 3533.31,2074.33 6906.69,2074.33 6993.31,2074.33 6906.69,3500.67 6993.31,3500.67 3446.69,3503.19 3533.3,3503.19 6845.67,3561.69 7054.33,3561.69 3385.67,3564.21 3594.33,3564.21 6845.67,3648.31 7054.33,3648.31 3385.67,3650.83 3594.33,3650.83 6906.69,3709.33 6993.31,3709.33 3446.69,3711.85 3533.3,3711.85

## Polygon pours and split planes (outlines as drawn)
GND on Bottom Layer "GND_L02_P004" (solid, remove dead copper, pour order 4): 3327.5,1969.8 ccw(c3490,1970) 3490,1807.51 6950,1807.51 ccw(c6950,1970) 7112.49,1970 7112.49,3605 ccw(c6950,3605) 6954.38,3767.43 ccw(c6950,3765) 6950,3770.02 6611.86,3770.02 ccw(c6545,3750.31) 6478.14,3770.01 3489.99,3770.01 ccw(c3489.99,3607.52) 3327.62,3613.78 3327.5,3612.68
GND on Top Layer "GND_L01_P000" (solid, remove dead copper, pour order 0): 3327.51,1969.8 ccw(c3490,1970) 3490,1807.51 6950,1807.51 ccw(c6950,1970) 7112.49,1970 7112.49,3605 ccw(c6950,3605) 6954.38,3767.43 ccw(c6950,3765) 6950,3770.01 6611.86,3770.01 ccw(c6545,3750.31) 6478.14,3770.01 3489.99,3770.01 ccw(c3489.99,3607.52) 3327.62,3613.78 3327.5,3612.68

## Keep-outs
Top Layer:
  lines w10: 3332.52,3607.52 cw(c3490,3607.52) 3490,3765 6482,3765 cw(c6545,3750.31) 6608,3765 6860,3765 6950,3765 ; 3332.52,3612.68 3332.52,1970 ; 6950,3762.48 cw(c6950,3605) 7107.48,3605 7107.48,1970 cw(c6950,1970) 6950,1812.52 3490,1812.52 cw(c3490,1970) 3332.52,1970 ; 3332.51,1970 3332.52,1970 ; 3332.52,1970 3332.52,1970
Bottom Layer:
  lines w10: 3332.52,3607.52 cw(c3489.99,3607.52) 3490,3765 6482,3765 cw(c6545,3750.31) 6608,3765 6860,3765 6950,3765 ; 3332.51,3612.68 3332.51,1970 ccw(c3490,1970) 3490,1812.52 6950,1812.52 ccw(c6950,1970) 7107.48,1970 7107.48,3605 ccw(c6950,3605) 6950,3762.48

## Other copper
Top Layer:
  pour cut-out: 5907.03,3584.83 5907.19,3585 5915,3585 5915,3445 5913.28,3446.72 5907.03,3446.72
Bottom Layer:
  pour cut-out: 6297.5,2705 6437.5,2705 6437.5,2570 6302.5,2570 6297.5,2575
  pour cut-out: 6295,3705 6435,3705 6435,3570 6300,3570 6295,3575

## Silkscreen, mask and mechanical layers (free items; w line width, h text height)
Top Overlay:
  drawing of 12 lines, arcs and shapes, not listed
  text "2353278" at 3435,2990 h60 r270
  text "Assignment_CC02" at 6970.01,2335 h60 r90

## Text inside footprints (layer, text, board x,y; h text height)
LED2: Top Overlay "B" at 5825,1820 h70.87; Top Overlay "R" at 6120,1820 h70.87
U2: Mechanical 13 "ANTENNA" at 4643.43,3602.24 h70